# Altium PCB PCB-Powermodule-v7.0.3.PcbDoc (part 2 of 3)
Units mil, origin at the board's own origin, x right, y up, seen from the top; angles counter-clockwise.
Board outline 3937.01 x 1771.65 mil, 2 copper layers (Top Layer, Bottom Layer), stack 61.811 mil thick; 138 components, 96 nets, 573 pads, 259 vias.
Unrouted connection lines stored in the file: 20.
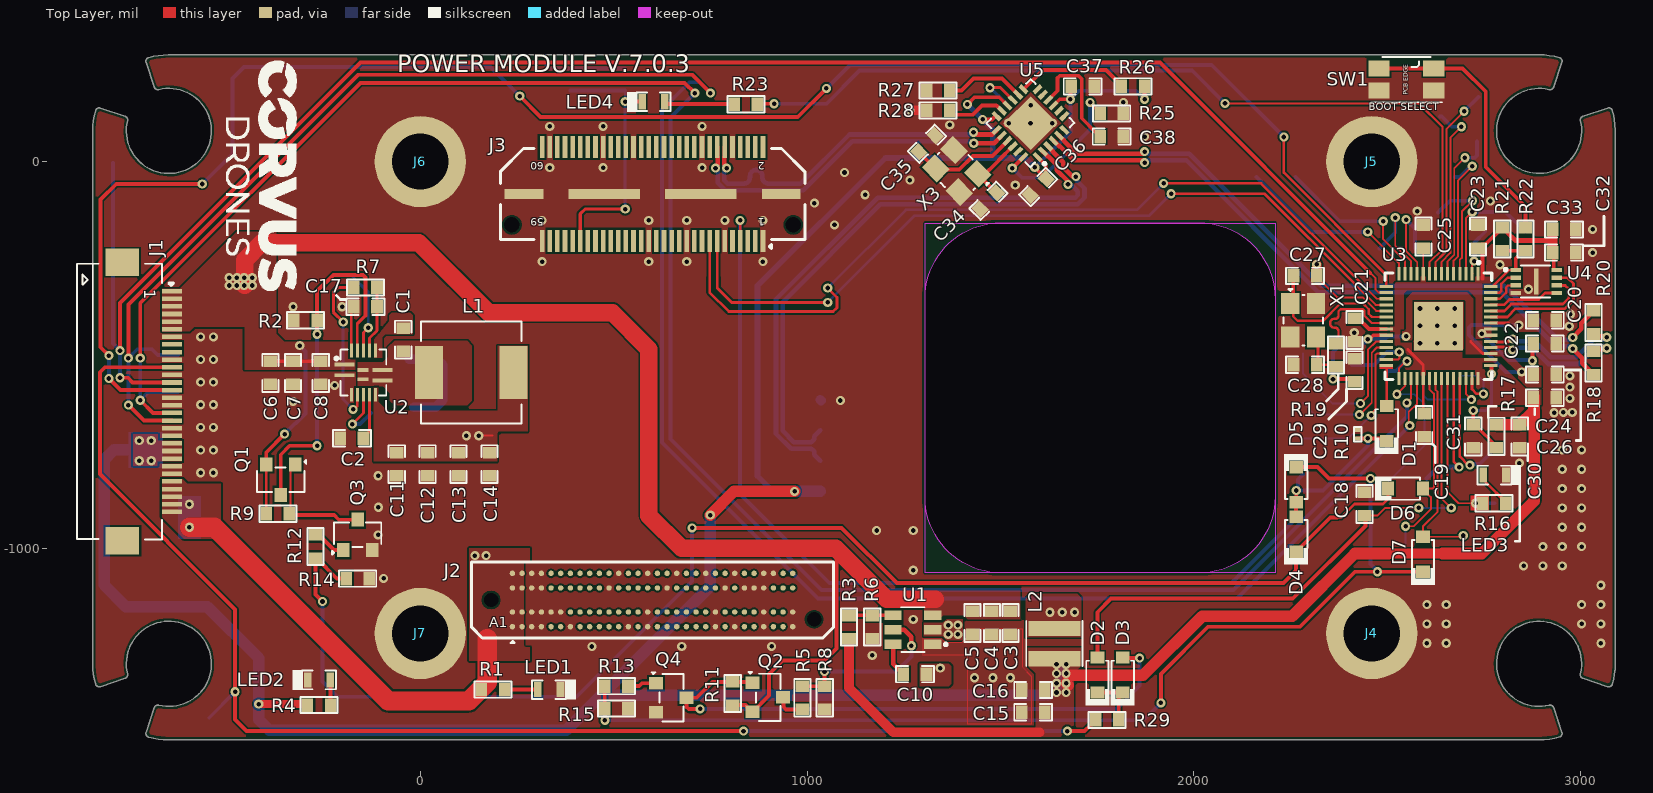
[diagram p0: Top Layer view]

## Part data (continued)
R9 R11: library part RC0603FR-071ML, "RES SMD 1M OHM 1% 1/10W 0603", Case Code (Imperial)=0603, Case Code (Metric)=1608, LCSC Part Number=C105578, MANUFACTURER=Yageo, Max Operating Temperature=155°C, Min Operating Temperature=-55°C, Package Quantity=5000, Power Rating=100mW, Resistance=1MR, Supplier Part Number 1=311-1.00MHRDKR-ND, Temperature Coefficient=100ppm/°C, Tolerance=1%, Voltage Rating=50V, Case/Package=0603, ComponentLink1Description=http://www.farnell.com/datasheets/2167052.pdf?src-supplier=Mouser, ComponentLink1URL=http://www.farnell.com/datasheets/2167052.pdf?src-supplier=Mouser, ComponentLink2Description=http://www.farnell.com/datasheets/2167052.pdf?src-supplier=Element14, ComponentLink2URL=http://www.farnell.com/datasheets/2167052.pdf?src-supplier=Element14, ComponentLink3Description=http://documents.rs-components.com/techlib://itc_doclist_GB.htm?stockno=5048956&src-supplier=RSComponents, ComponentLink3URL=http://documents.rs-components.com/techlib://itc_doclist_GB.htm?stockno=5048956&src-supplier=RSComponents, Composition="Thick Film", Depth=0.8mm, Height=0.45mm, Item Type=Resistor, Lead Free="Lead Free", Length=1.6mm, Manufacturer Part Number=RC0603FR-071ML, Military Standard=Not, Number of Pins=2, Packaging="Tape and Reel", Pricing 1="1=0.1, 10=0.023, 100=0.0094, 1000=0.00421, 2500=0.00366 (USD)", REACH SVHC="No SVHC", Stock 1=3824601, Supplier 1=Digi-Key, Termination=SMD/SMT, Voltage Rating (DC)=50V, Width=0.8mm
R10: library part RC0201FR-0710KL, "RES SMD 10K OHM 1% 1/20W 0201", LCSC Part Number=C106225, MANUFACTURER=Yageo, Package=0201, ComponentLink7Description=LCSC, ComponentLink7URL=https://www.lcsc.com/product-detail/Chip-Resistor-Surface-Mount_YAGEO-RC0201FR-0710KL_C106225.html, Item Type=Resistor, Manufacturer Part Number=RC0201FR-0710KL
R12 R13: library part RC0603JR-074K7L, "RES SMD 4.7K OHM 5% 1/10W 0603", Case Code (Imperial)=0603, Case Code (Metric)=1608, LCSC Part Number=C105428, MANUFACTURER=Yageo, Max Operating Temperature=155°C, Min Operating Temperature=-55°C, Power Rating=100mW, Resistance=4.7kR, Supplier Part Number 1=311-4.7KGRCT-ND, Temperature Coefficient=100ppm/°C, Tolerance=5%, Voltage Rating=50V, Case/Package=0603, ComponentLink1Description=http://www.farnell.com/datasheets/443971.pdf?src-supplier=Element14, ComponentLink1URL=http://www.farnell.com/datasheets/443971.pdf?src-supplier=Element14, Composition="Thick Film", Depth=0.8mm, Item Type=Resistor, Lead Free="Lead Free", Length=1.6mm, Manufacturer Part Number=RC0603JR-074K7L, Military Standard=Not, Number of Pins=2, Packaging="Tape and Reel", Pricing 1="1=0.1, 10=0.02, 100=0.0081, 1000=0.00362, 2500=0.00314 (USD)", REACH SVHC="No SVHC", Stock 1=19706643, Supplier 1=Digi-Key, Termination=SMD/SMT, Voltage Rating (DC)=50V, Width=0.8mm
R18 R20: library part RC0603FR-0727RL, "RES 27 OHM 1% 1/10W 0603", Case Code (Imperial)=0603, Case Code (Metric)=1608, LCSC Part Number=C137753, MANUFACTURER=Yageo, Max Operating Temperature=155°C, Max Power Dissipation=100mW, Min Operating Temperature=-55°C, Resistance Tolerance=1%, Resistor Type="Thick Film", Supplier Part Number 1=9798455, Temperature Coefficient=100ppm/°C, Voltage Rating=50V, Case/Package=0603, Category="Chip SMD Resistors", ComponentLink1Description=https://datasheet.ciiva.com/2454/pyu-r-int-thick-7-2454031.pdf?src-supplier=Digi-Key, ComponentLink1URL=https://datasheet.ciiva.com/2454/pyu-r-int-thick-7-2454031.pdf?src-supplier=Digi-Key, ComponentLink2Description=https://datasheet.ciiva.com/2454/pyu-r-int-thick-7-2454032.pdf?src-supplier=Digi-Key, ComponentLink2URL=https://datasheet.ciiva.com/2454/pyu-r-int-thick-7-2454032.pdf?src-supplier=Digi-Key, ComponentLink3Description=https://datasheet.ciiva.com/2454/pyu-r-int-thick-7-2454030.pdf?src-supplier=Digi-Key, ComponentLink3URL=https://datasheet.ciiva.com/2454/pyu-r-int-thick-7-2454030.pdf?src-supplier=Digi-Key, ComponentLink4Description=https://datasheet.ciiva.com/7746/443971-7746313.pdf?src-supplier=Element14, ComponentLink4URL=https://datasheet.ciiva.com/7746/443971-7746313.pdf?src-supplier=Element14, ComponentLink5Description=https://datasheet.ciiva.com/7746/443971-7746314.pdf?src-supplier=Element14, ComponentLink5URL=https://datasheet.ciiva.com/7746/443971-7746314.pdf?src-supplier=Element14, Features="Moisture Resistant", Item Type=Resistor, Lead Free="Lead Free", Manufacturer Part Number=RC0603FR-0727RL, Number of Terminations=2, Packaging="Tape and Reel", Pins=2, Power Rating=100mW, Pricing 1="5000=0.0015, 50000=0.0014, 200000=0.0014, 625000=0.0013, 2000000=0.0012 (USD)", Reach SVHC Compliant=Unknown, RoHS=Yes, RoHS Compliant=Yes, Series=RC, Stock 1=285000, Supplier 1="Future Electronics", Termination=SMD/SMT, Tolerance=1%, Voltage Rating (DC)=50V, Width=0.8mm
R19 R22 R24 R29: library part RT0603DRD071KL, "RES SMD 1K OHM 0.5% 1/10W 0603", Case Code (Imperial)=0603, Case Code (Metric)=1608, LCSC Part Number=C165964, MANUFACTURER=Yageo, Max Operating Temperature=125°C, Min Operating Temperature=-55°C, Power Rating=100mW, Resistance=1kR, Supplier Part Number 1=311-1.0KDDKR-ND, Temperature Coefficient=25ppm/°C, Tolerance=0.5%, Voltage Rating=75V, Voltage Rating (DC)=50V, Case/Package=0603, ComponentLink1Description=http://www.mouser.com/ds/2/447/yageodocoutput-1125656.pdf?src-supplier=Mouser, ComponentLink1URL=http://www.mouser.com/ds/2/447/yageodocoutput-1125656.pdf?src-supplier=Mouser, ComponentLink2Description=http://www.yageo.com/documents/recent/PYu-RT_1-to-0.05_RoHS_L_6.pdf?src-supplier=Avnet, ComponentLink2URL=http://www.yageo.com/documents/recent/PYu-RT_1-to-0.05_RoHS_L_6.pdf?src-supplier=Avnet, Composition="Thin Film", Contact Plating=Tin,Matte, Lead Free="Lead Free", Manufacturer Part Number=RT0603DRD071KL, Packaging="Tape and Reel", Pricing 1="1=0.2, 10=0.167, 100=0.0651, 1000=0.02725, 2500=0.02498 (USD)", Radiation Hardening=No, Stock 1=178947, Supplier 1=Digi-Key, Termination=SMD/SMT
R25: library part RTT031202BTP, "12kΩ 0603 Chip Resistor - Surface Mount ROHS", LCSC Part Number=C2981490, MANUFACTURER=RALEC, ComponentLink1Description=LCSC, ComponentLink1URL=https://lcsc.com/product-detail/Chip-span-style-background-color-ff0-Resistor-span-Surface-Mount_RALEC-RTT031202BTP_C2981490.html, Manufacturer Part Number=RTT031202BTP
R26 R27 R28: library part RT0603BRD0750KL, "RES 50K OHM 0.1% 1/10W 0603", Case/Package=0603, LCSC Part Number=C861451, MANUFACTURER=Yageo, Max Operating Temperature=155°C, Max Power Dissipation=100mW, Min Operating Temperature=-55°C, Supplier Part Number=3072856, Temperature Coefficient=25ppm/°C, Tolerance=0.1%, Voltage Rating=75V, Category="Chip SMD Resistors", ComponentLink1Description=https://www.yageo.com/upload/media/product/productsearch/datasheet/rchip/PYu-RT_1-to-0.01_RoHS_L_12.pdf?src-supplier=Digikey, ComponentLink1URL=https://www.yageo.com/upload/media/product/productsearch/datasheet/rchip/PYu-RT_1-to-0.01_RoHS_L_12.pdf?src-supplier=Digikey, Height=550um, Item Type=Resistor, Manufacturer Part Number=RT0603BRD0750KL, Number of Terminations=2, Packaging="Tape and Reel", Power Rating=100mW, Pricing="5000=0.0213, 15000=0.0206, 25000=0.0211, 50000=0.0198, 100000=0.0194, 200000=0.0186 (USD)", RoHS=No, Series=RT, Stock=70000, Supplier="Future Electronics"
SW1: "SWITCH TACTILE SPST-NO 0.05A 12V", Actuator Color=Black, Case/Package=SMD/SMT, Contact Current Rating=50mA, Contact Resistance=500mR, MANUFACTURER=Panasonic, Max Operating Temperature=70°C, Max Voltage Rating (DC)=12V, Min Operating Temperature=-20°C, Operating Force=1.6N, Package Quantity=5000, Supplier Part Number=667-EVQP7J01P, Actuator Length=0.65mm, Category="Tactile Switches", ComponentLink1Description=https://datasheet.ciiva.com/24076/atv0000ce4-259034-24076561.pdf?src-supplier=Mouser, ComponentLink1URL=https://datasheet.ciiva.com/24076/atv0000ce4-259034-24076561.pdf?src-supplier=Mouser, ComponentLink2Description=https://datasheet.ciiva.com/22777/atk0000ce20-22777575.pdf?src-supplier=Farnell, ComponentLink2URL=https://datasheet.ciiva.com/22777/atk0000ce20-22777575.pdf?src-supplier=Farnell, ComponentLink3Description=https://datasheet.ciiva.com/29974/atk0000ce20-29974069.pdf?src-supplier=Avnet, ComponentLink3URL=https://datasheet.ciiva.com/29974/atk0000ce20-29974069.pdf?src-supplier=Avnet, ComponentLink4Description=https://datasheet.ciiva.com/30252/atk0000ce20-30252044.pdf?src-supplier=Onlinecomponents.com, ComponentLink4URL=https://datasheet.ciiva.com/30252/atk0000ce20-30252044.pdf?src-supplier=Onlinecomponents.com, Current Rating=50mA, Electrical Life=100000Cycles, Height=1.35mm, Illumination Type=Non-Illuminated, Item Type=SWITCH, Lead Free="Lead Free", Length=3.5mm, Manufacturer Part Number=EVQ-P7J01P, Mechanical Life=100000Cycles, Mounting Technology="Surface Mount", Orientation="Right Angle", Packaging="Tape and Reel", Pricing="1=0.28, 10=0.252, 50=0.252, 100=0.217, 1000=0.173, 10000=0.148 (USD)", Radiation Hardening=No, Reach SVHC Compliant=No, RoHS=Yes, RoHS Compliant=Yes, Series=EVQP7, Stock=9778, Supplier=Mouser, Switch Function=Off-Mom, Switch Travel=0.2mm, Termination="Gull Wing", Throw Configuration=SPST, Voltage Rating (DC)=12V, Width=2.9mm
SW2: library part EVQ-P7J01P, "SWITCH TACTILE SPST-NO 0.05A 12V", Actuator Color=Black, Case/Package=SMD/SMT, Contact Current Rating=50mA, Contact Resistance=500mR, MANUFACTURER=Panasonic, Max Operating Temperature=70°C, Max Voltage Rating (DC)=12V, Min Operating Temperature=-20°C, Operating Force=1.6N, Package Quantity=5000, Supplier Part Number=667-EVQP7J01P, Actuator Length=0.65mm, Category="Tactile Switches", ComponentLink1Description=https://datasheet.ciiva.com/24076/atv0000ce4-259034-24076561.pdf?src-supplier=Mouser, ComponentLink1URL=https://datasheet.ciiva.com/24076/atv0000ce4-259034-24076561.pdf?src-supplier=Mouser, ComponentLink2Description=https://datasheet.ciiva.com/22777/atk0000ce20-22777575.pdf?src-supplier=Farnell, ComponentLink2URL=https://datasheet.ciiva.com/22777/atk0000ce20-22777575.pdf?src-supplier=Farnell, ComponentLink3Description=https://datasheet.ciiva.com/29974/atk0000ce20-29974069.pdf?src-supplier=Avnet, ComponentLink3URL=https://datasheet.ciiva.com/29974/atk0000ce20-29974069.pdf?src-supplier=Avnet, ComponentLink4Description=https://datasheet.ciiva.com/30252/atk0000ce20-30252044.pdf?src-supplier=Onlinecomponents.com, ComponentLink4URL=https://datasheet.ciiva.com/30252/atk0000ce20-30252044.pdf?src-supplier=Onlinecomponents.com, Current Rating=50mA, Electrical Life=100000Cycles, Height=1.35mm, Illumination Type=Non-Illuminated, Item Type=SWITCH, Lead Free="Lead Free", Length=3.5mm, Manufacturer Part Number=EVQ-P7J01P, Mechanical Life=100000Cycles, Mounting Technology="Surface Mount", Orientation="Right Angle", Packaging="Tape and Reel", Pricing="1=0.28, 10=0.252, 50=0.252, 100=0.217, 1000=0.173, 10000=0.148 (USD)", Radiation Hardening=No, Reach SVHC Compliant=No, RoHS=Yes, RoHS Compliant=Yes, Series=EVQP7, Stock=9778, Supplier=Mouser, Switch Function=Off-Mom, Switch Travel=0.2mm, Termination="Gull Wing", Throw Configuration=SPST, Voltage Rating (DC)=12V, Width=2.9mm
U1: "IC REG BUCK ADJ 3A TSOT23-6", Case/Package=SOT-23-6, LCSC Part Number=C116592, MANUFACTURER="Texas Instruments", Max Input Voltage=17V, Max Operating Temperature=125°C, Max Output Voltage=7V, Min Input Voltage=4.5V, Min Operating Temperature=-40°C, Min Output Voltage=768mV, Output Current=3A, Quiescent Current=400uA, Supplier Part Number 1=296-47238-6-ND, Switching Frequency=580kHz, ComponentLink1Description=http://www.ti.com/lit/ds/symlink/tps563201.pdf?src-supplier=Digi-Key, ComponentLink1URL=http://www.ti.com/lit/ds/symlink/tps563201.pdf?src-supplier=Digi-Key, ComponentLink2Description=http://www.ti.com/general/docs/suppproductinfo.tsp?distId=10&amp;gotoUrl=http%3A%2F%2Fwww.ti.com%2Flit%2Fgpn%2Ftps563201&src-supplier=Digi-Key, ComponentLink2URL=http://www.ti.com/general/docs/suppproductinfo.tsp?distId=10&amp;gotoUrl=http%3A%2F%2Fwww.ti.com%2Flit%2Fgpn%2Ftps563201&src-supplier=Digi-Key, ComponentLink3Description=http://www.ti.com/lit/gpn/tps563201?src-supplier=Mouser, ComponentLink3URL=http://www.ti.com/lit/gpn/tps563201?src-supplier=Mouser, Item Type=IC, Lead Free="Lead Free", Manufacturer Part Number=TPS563201DDCR, Mount="Surface Mount", Number of Outputs=1, Number of Pins=6, Output Configuration=Positive, Output Type=Adjustable, Packaging="Tape and Reel", Pricing 1="1=0.92, 10=0.812, 25=0.7628, 100=0.5781, 250=0.492, 500=0.4674, 1000=0.3567 (USD)", Stock 1=0, Supplier 1=Digi-Key, Synchronous Rectifier=Yes
U2: "Step-down type Fixed 5V 5V~23V 6A QFN-16(3x3) DC-DC Converters ROHS", LCSC Part Number=C425179, MANUFACTURER=Richtek, Supplier Part Number=1028-RT7291AGQUFCT-ND, Category="Voltage Regulators - Switching", Item Type=IC, Manufacturer Part Number=RT7291AGQUF, Pricing="1=2.62, 10=2.355, 25=2.222, 100=1.8931, 250=1.7776, 500=1.5554 (USD)", RoHS=No, Stock=1332, Supplier=Digi-Key
U3: "Rectifier Diode, 1 Phase, 1 Element, 2A, 400V V(RRM), Silicon, DO-15", MANUFACTURER="Raspberry Pi", Supplier Part Number=3766079, Category=Uncategorized, Manufacturer Part Number=RP2040TR7, Pricing="500=0.645 (GBP)", RoHS=No, Stock=11495, Supplier=Farnell
U4: "IC FLASH 16MBIT SPI/QUAD 8USON", MANUFACTURER=Winbond, Supplier Part Number=256-W25Q16JVUXIQTRCT-ND, Category=Memory, Manufacturer Part Number="W25Q16JVUXIQ TR", Pricing="1=0.56, 10=0.51, 25=0.504, 50=0.501, 100=0.4479, 250=0.44416, 500=0.43758, 1000=0.42193 (USD)", RoHS=No, Stock=47295, Supplier=Digi-Key
U5: "Hub Controller USB QFN-24-EP(4x4) USB ICs ROHS", LCSC Part Number=C633330, MANUFACTURER=Microchip, Category="USB Interface ICs", ComponentLink1Description=http://components.arrow.com/part/dataview/58768923S663889N2064?src-supplier=Arrow+Electronics, ComponentLink1URL=http://components.arrow.com/part/dataview/58768923S663889N2064?src-supplier=Arrow+Electronics, ComponentLink2Description=http://www.mouser.com/ds/2/268/2422-319423.pdf?src-supplier=Mouser, ComponentLink2URL=http://www.mouser.com/ds/2/268/2422-319423.pdf?src-supplier=Mouser, ComponentLink3Description=http://www.microchip.com/mymicrochip/filehandler.aspx?ddocname=en566992&src-supplier=Digikey, ComponentLink3URL=http://www.microchip.com/mymicrochip/filehandler.aspx?ddocname=en566992&src-supplier=Digikey, ComponentLink4Description=https://datasheet.octopart.com/USB2422-MJ-Microchip-datasheet-42223901.pdf?src-supplier=Future+Electronics, ComponentLink4URL=https://datasheet.octopart.com/USB2422-MJ-Microchip-datasheet-42223901.pdf?src-supplier=Future+Electronics, Item Type=IC, Manufacturer Part Number=USB2422/MJ, Pricing="490=1.5 (USD)", RoHS=Yes, Stock=330, Supplier=Avnet, Supplier Part Number=USB2422/MJ
U6: "Intelligent WiFiI Module 1200M Dual Band+AC (High Power)", ComponentLink1Description=Aliexpress, ComponentLink1URL=https://www.aliexpress.com/item/1005005638445796.html?spm=a2g0o.order_list.order_list_main.29.65f179d27FZF0V&gatewayAdapt=glo2nld, Item Type=Module, Manufacturer Part Number=BL-R8812AF1
X1: library part MCSJK-7U-12.00-10-10-80-B-10, "Crystal, 12Mhz, 10Pf, 3.2Mm X 2.5Mm Frequency Nom 12Mhz Crystal Case Smd Rohs", MANUFACTURER=Multicomp, Supplier Part Number=56AC8904, ComponentLink1Description=http://www.farnell.com/datasheets/2645227.pdf?src-supplier=Farnell, ComponentLink1URL=http://www.farnell.com/datasheets/2645227.pdf?src-supplier=Farnell, Item Type=Crystal, Manufacturer Part Number=MCSJK-7U-12.00-10-10-80-B-10, Pricing="1=0.428, 10=0.381, 100=0.3, 500=0.246, 1000=0.214, 5000=0.191, 10000=0.172, 25000=0.166 (USD)", RoHS=Yes, Stock=26807, Supplier=Newark
X3: library part MCSJK-7U-24.00-12-10-60-B-10, "Crystal, 24Mhz, 12Pf, 3.2Mm X 2.5Mm", MANUFACTURER=Multicomp, Supplier Part Number=56AC8946, Item Type=Crystal, Manufacturer Part Number=MCSJK-7U-24.00-12-10-60-B-10, Pricing="5=0.328, 250=0.253, 500=0.227, 1000=0.207, 5000=0.189 (USD)", RoHS=No, Stock=5313, Supplier=Newark

## Via types
v1: diameter 23.62, hole 11.81, Top Layer to Bottom Layer, tented both sides, 257 vias
v2: diameter 23.62, hole 11.81, Top Layer to Bottom Layer, 2 vias

## Nets (pads, with @x,y where several pads share a name; then routed paths per layer and width w, separated by ;. In a path a pad name is that pad's centre, name@x,y a point inside that pad or via, vN(x,y) a via of type N, cw(c..) or ccw(c..) an arc to the next point about the centre after c; other vN are vias at no path point)
+1V1: C20.2 C26.2 C29.2 U3.23 U3.45 U3.50 | length 818.2
  Top Layer w7: 2716.15,-465.61 2747.03,-496.48 U3.45@2768.15,-496.48 ; U3.50@2768.15,-417.74 2814.03,-417.74
  Top Layer w10: v1(2360,-562.61) 2409.8,-562.61 C29.2@2412.8,-559.61 ; v1(2450.31,-459.29) 2454,-459.29 2464.06,-449.23 U3.23@2497.45,-449.23
  Bottom Layer w10: v1(2360,-562.61) 2360,-492.35 2371.75,-480.59 2429.01,-480.59 v1(2450.31,-459.29) 2494.71,-459.29 2502,-452 v1(2549,-452) ; v1(2841,-423) 2718,-423 2712.14,-428.86 2712.14,-448.36 2807.79,-544 v1(2848,-544)
+3V3: C15.2 C16.2 C19.1 C21.1 C22.2 C23.2 C24.1 C25.2 C30.2 C32.2 C33.2 C36.2 C37.2 J1.21 J1.22 J1.23 L2.2 P7.1 R3.2 R4.2 R17.2 R21.2 R26.1 U3.1 U3.10 U3.22 U3.33 U3.42 U3.44 U3.48 U3.49 U4.8 U5.1 U5.9 U5.16 U5.18 U6.2 | length 10149.7
  Top Layer w5: U3.10@2593.43,-290.26 2593.43,-224.57 C25.2@2594,-224
  Top Layer w7: 2553.29,-486.29 2593.44,-526.44 C19.1@2593.44,-654.58
  Top Layer w10: v1(1414.42,147.81) 1432.8,166.18 1497.09,166.18 U5.16@1518.42,144.85 ; v1(1453.97,109.06) 1477.81,109.06 1487.81,119.06 U5.18@1490.33,116.54 ; v1(1588.88,-15.22) C36.2@1618.06,-44.4 ; U5.1@1595.76,11.84 1617.25,-9.65 C36.2@1617.25,-42.63 ; U5.9@1637.51,145.18 1653.33,161 v1(1681,161) 1681,192.59 C37.2@1682.8,194.39 ; v1(1872.8,161) R26.1@1872.8,187.73 ; C21.1@2425.3,-403.61 2425.3,-406.11 2452.67,-433.48 U3.22@2497.45,-433.48 ; 2747,-302 2746.57,-301.57 2746.57,-266.75 2746.91,-266.41 2746.91,-234 2736.91,-224 C23.2@2735,-224 2745,-214 2754.41,-214 2785.3,-183.11 2785.3,-180.61 2795.3,-170.61 R21.2@2797.8,-170.61 ; v1(2875.85,-515.15) 2875.85,-472.56 C22.2@2877.8,-470.61 ; C32.2@2927.8,-235.61 2931.05,-238.86 U4.8@2931.05,-280.63
  Top Layer w12: R21.2@2796.12,-166.43 2809.3,-179.61 2809.3,-182.11 2831.19,-204 2921.9,-204
  Top Layer w20: v1(-418,-1403) -294.81,-1403 R4.2@-292.2,-1405.61
  Top Layer w25: R3.2@1108.39,-1233.8 1108.39,-1361.39 1223,-1476 1602,-1476 ; 2502.8,-1013.61 2643.39,-1013.61 ; C32.2@2927.8,-235.61 C33.2@2927.8,-175.61
  Top Layer w30: v1(749.68,-914.44) 811.12,-853 v1(967.6,-853) ; v1(1670,-1349) v1@1674.85,-1353.85 ; v1@1674.85,-1328.85 1868.83,-1328.85 2022.18,-1175.5 2255.02,-1175.5 2416.91,-1013.61 2502.8,-1013.61 ; 2643.39,-1013.61 2744.39,-1013.61 2880.3,-877.7 2880.3,-643.61 ; R17.2@2782.8,-680.61 C30.2@2842.8,-680.61 2879.8,-643.61 C24.1@2879.8,-608.61
  Bottom Layer w10: v1(1588.88,-15.22) 1681,76.89 v1(1681,161) 1702.98,182.98 1850.82,182.98 v1(1872.8,161) ; v1(2745,-444.81) 2813.19,-513 2873.7,-513 v1(2875.85,-515.15)
  Bottom Layer w15: v1(967.6,-853) 912,-853 872,-813 872,-321.11 1202.61,9.51 1564.15,9.51 v1(1588.88,-15.22) ; v1@1414.83,147.81 v1@1453.57,109.06 ; v1(1453.97,109.06) 1480.39,82.64 1480.39,9.51
  Bottom Layer w20: v1(1414.42,147.81) v1@1414.83,147.81 ; v1@1453.57,109.06 v1(1453.97,109.06)
  Bottom Layer w30: v1(-696,-721.61) -696,-744.41 P7.1@-697.2,-745.61 -792.39,-745.61 -817.79,-771.01 -817.79,-1094.88 -761.67,-1151 -551,-1151 -418,-1284 v1(-418,-1403) -418,-1443 -390.39,-1470.61 377.39,-1470.61 467.75,-1380.25 ; v1(749.68,-914.44) 749.68,-1098.32 467.75,-1380.25 ; v1(967.6,-853) 1032.95,-853 U6.2@1033.84,-852.11 ; 1612.26,-1380.25 467.75,-1380.25 ; 1623,-1380 v1@1649.5,-1353.5 ; 1657,-1346 1657,-1297.03
  other v1: 1645,-1373 1670,-1373 1645,-1349 1645,-1324 1670,-1324 1645,-1300 1670,-1300 -727.17,-773.57 -696,-773.57 -727.17,-721.61
+5V: C11.2 C12.2 C13.2 C14.2 J1.26 J1.27 J1.28 J1.29 J1.30 J2.A01 J2.A02 J2.B01 J2.B02 J2.C01 J2.C02 J2.D01 J2.D02 L1.2 P2.1 R1.2 U2.7 | length 1126
  Top Layer w5: v1@151,-710 152,-709 183,-709 184,-708 187,-708
  Top Layer w50: v1(-597.2,-945.61) -532.39,-945.61 -83,-1395 125,-1395 157.34,-1362.65 172.8,-1347.2 172.8,-1234
  other v1: 141,-1019 170,-1019 -597.2,-886.34 119,-709 151,-709
ADC_AVDD: C31.2 R17.1 U3.43 | length 268.2
  Top Layer w8: C31.2@2726.8,-680.61 R17.1@2782.8,-736.61
  Top Layer w10: C31.2@2722.8,-680.61 v1(2722.8,-643.82) ; v1(2769.65,-549.1) U3.43@2769.65,-529.97
  Bottom Layer w8: v1(2722.8,-643.82) 2723.01,-643.61 2755.39,-643.61 2769.65,-629.35 v1(2769.65,-549.1)
BOOTSEL_MCU: J3.17
CLK: P1.1 U2.5 | length 149.3
  Top Layer w7: v1(-176,-679) -147.2,-650.2 U2.5@-147.2,-602.68
  Bottom Layer w10: v1(-176,-679) -156,-679 P1.1@-127,-650
D_N: R18.2 U5.4 | length 1661
  Top Layer w12: U5.4@1637.51,53.6 1638.2,53.6 1651.66,40.14 1652.87,40.14 1690.01,3 1866.99,3 v1(1872.8,-2.81) ; v1(2980,-483.62) 3005,-508.62 3005,-522 3022.5,-539.5 3022.5,-542 3031.5,-551 R18.2@3034,-551
  Bottom Layer w12: v1(1872.8,-2.81) 1875.95,-2.81 1881.76,3 1981.12,3 2322.12,-338 2796,-338 2935.81,-477.81 2971.04,-477.81 2976.86,-483.62 v1(2980,-483.62)
D_P: R20.2 U5.5 | length 1648.6
  Top Layer w12: U5.5@1651.43,67.51 1651.43,66.82 1664.89,53.37 1664.89,52.16 1697.05,20 1866.99,20 v1(1872.8,25.81) ; v1(2980,-455) 3002.36,-432.64 3002.36,-417.64 3022.5,-397.5 3022.5,-395 3031.5,-386 R20.2@3034,-386
  Bottom Layer w12: v1(1872.8,25.81) 1875.95,25.81 1881.76,20 1988.16,20 2329.16,-321 2803.04,-321 2942.85,-460.81 2971.04,-460.81 2976.86,-455 v1(2980,-455)
EN_3V3_BUCK: Q2.3 R5.1 | length 76.3
  Top Layer w10: Q2.3@938.17,-1385.61 939,-1386.44 939,-1410 945.61,-1416.61 R5.1@987.8,-1416.61
EN_VOXL: Q1.3 R2.1 U2.13 | length 946.6
  Top Layer w7: U2.13@-162.94,-488.52 -162.94,-419.39
  Top Layer w8: -162.94,-419.39 -142.19,-398.64
  Top Layer w10: Q1.3@-361.2,-859.24 -361.2,-758.2 -338,-735 v1(-267.2,-735) ; v1(-267.2,-446.64) R2.1@-267.2,-411.81 ; R2.1@-267.2,-410.61 -267.2,-335.2 -225.06,-293.05 -148.51,-293.05 -142.19,-299.38 -142.19,-398.64
  Bottom Layer w10: v1@-276,-735 v1@-275.61,-734.6 ; v1(-267.2,-735) v1(-267.2,-446.64)
ENLDO: P8.1 U2.12 | length 215.6
  Top Layer w7: U2.12@-147.2,-488.51 -147.19,-442.19 v1(-134.82,-429.82)
  Bottom Layer w7: P8.1@-177.2,-295.61 -134.82,-337.99 v1(-134.82,-429.82)
GND: C2.1 C3.1 C4.1 C5.1 C6.1 C7.1 C8.1 C11.1 C12.1 C13.1 C14.1 C15.1 C16.1 C17.1 C18.1 C19.2 C20.1 C21.2 C22.1 C23.1 C24.2 C25.1 C26.1 C27.2 C28.2 C29.1 C30.1 C31.1 C32.1 C33.1 C34.1 C35.2 C36.1 C37.1 C38.1 J1.7 J1.10 J1.12 J1.15 J1.16 J1.19 J1.20 J1.24 J1.25 J2.A03 J2.A04 J2.A07 J2.A13 J2.A15 J2.A22 J2.A24 J2.A27 J2.A30 J2.B03 J2.B04 J2.B05 J2.B06 J2.B15 J2.B22 J2.B27 J2.B30 J2.C03 J2.C04 J2.C11 J2.C17 J2.C23 J2.C25 J2.C26 J2.C27 J2.D03 J2.D04 J2.D12 J2.D15 J2.D18 J2.D21 J2.D24 J2.D27 J2.D28 J3.01 J3.10 J3.11 J3.18 J3.21 J3.31 J3.36 J3.44 J3.58 J3.59 J3.G1 J3.G2 J3.G3 J3.G4 J4.1 J5.1 J6.1 J7.1 LED1.2 LED2.2 LED3.2 P4.1 P5.1 P32.1 Q3.2 Q4.2 R2.2 R6.2 R8.1 R10.1 R14.2 R15.2 R24.2 R25.2 R27.1 R28.1 SW1.1 U1.1 U2.2 U2.3 U2.14 U3.19 U3.57 U4.4 U4.9 U5.25 U6.5 U6.7 U6.9 U6.10 U6.12 X1.2 X1.4 X3.2 X3.4 | length 696.4
  Top Layer w5: C27.2@2317.8,-298.11 2370.8,-351.11 2436.52,-351.11 2471.65,-386.25 U3.19@2497.45,-386.24
  Top Layer w6: -178.69,-442.14 C17.1@-178.69,-382.14
  Top Layer w7: U2.14@-178.69,-488.51 -178.69,-442.14
  Top Layer w20: R25.2@1817.8,124.39 1817.9,124.49 1817.9,152.9 v1(1818,153)
  Top Layer w25: v1(1265.87,132.43) R28.1@1308.78,132.43 ; U5.25@1521,99 U5.25@1521.39,99.39 ; U5.25@1577.8,145.96 U5.25@1577.92,146.08 ; C27.2@2317.8,-298.11 C27.2@2317.8,-295.61 v1(2317.8,-265.84)
  Bottom Layer w25: U6.7@-29.15,-511.56 43.36,-511.56 58,-526.2 58,-617 40,-635 U6.9@-16.82,-635 ; U6.5@1033.84,-615.89 U6.5@1035.95,-618
  other v1: 1433,-1335 1480.52,-1335 1525.95,-1335 1168.39,-1277 443.63,-1254.11 676,-1254 908.37,-1253.89 2602.8,-1245.61 2652.8,-1245.61 3052.8,-1245.61 2602.8,-1195.61 2652.8,-1195.61 3002.8,-1195.61 3052.8,-1195.61 1274.5,-1183.96 2602.8,-1145.61 2652.8,-1145.61 3002.8,-1145.61 3052.8,-1145.61 3052.8,-1095.61 -95,-1077.97 1274.5,-1057.03 2852.8,-1045.61 2902.8,-1045.61 2952.8,-1045.61 2902.8,-995.61 2952.8,-995.61 3002.8,-995.61 -109.2,-965.61 1180,-954.14 1274.5,-954.14 2952.8,-945.61 3002.8,-945.61 2952.8,-895.61 3002.8,-895.61 -108.66,-894 2952.8,-845.61 3002.8,-845.61 -109.2,-812.61 -568.17,-804.61 -535.17,-804.61 2952.8,-795.61 3002.8,-795.61 2842,-780 -568.17,-746.05 -535.17,-746.05 2952.8,-745.61 3002.8,-745.61 -568.17,-687.49 -535.17,-687.49 2931.8,-649.61 2955.8,-648.61 2978.8,-648.61 -568.17,-628.94 -535.17,-628.94 -329.19,-620.39 1086,-618 2972.8,-612.61 2972.8,-583.43 -222,-579 -568.17,-570.38 -535.17,-570.38 2972.8,-554.24 -568.17,-511.82 -535.17,-511.82 2585,-470 2630,-470 2675,-470 -568.17,-453.27 -535.17,-453.27 2415,-442.42 2971,-425.98 2585,-425 2630,-425 2675,-425 2973.85,-394.85 2585,-380 2630,-380 2675,-380 -329.19,-375.61 -202.61,-375.61 2865.68,-330.15 2792,-267 314.97,-258.57 590.56,-258.57 688.98,-258.57 885.83,-258.57 3031.5,-235.61 3031.5,-175.61 1071,-163.78 314.97,-152.15 590.56,-152.15 688.98,-152.15 787.41,-152.15 885.83,-152.15 2578,-128 1018.97,-107.35 2767,-102 1150,-86 1538.27,-61.08 1265.87,-48 1096.75,-28.35 334.65,-15.57 472.45,-15.57 728.35,-15.57 1872.8,64.39 334.65,90.85 472.45,90.85 728.35,90.85 1368.78,94.94 1521,99.39 1577.8,99.39 1634.19,99.39 1578.49,146.08
GPIO0: P11.1 U3.2 | length 122.4
  Top Layer w5: U3.2@2719.41,-290.26 2719.41,-271.1 cw(c2738.82,-271.1) v1(2725.1,-257.38)
  Top Layer w6: U3.2@2719.41,-290.26 U3.2@2720.35,-289.32
  Bottom Layer w10: v1@2725.8,-256.68 2725.8,-209.61 P11.1@2753.8,-181.61
GPIO1: P10.1 U3.3 | length 326.2
  Top Layer w5: U3.3@2703.67,-290.26 2703.66,-146.34 v1(2720,-130)
  Bottom Layer w10: v1(2720,-130) 2806.19,-130 P10.1@2857.8,-181.61
GPIO2: P12.1 U3.4 | length 304.6
  Top Layer w5: U3.4@2687.92,-290.26 2687.91,-254.56 2693.66,-248.81 2693.66,-128.98 v1(2721.24,-101.41)
  Bottom Layer w10: P12.1@2632,-132 2662.6,-101.41 v1(2721.24,-101.41)
GPIO3: P13.1 U3.5 | length 353.7
  Top Layer w5: U3.5@2672.17,-290.26 2672.16,-256.17 2683.66,-244.66 2683.66,-48.34 v1(2720,-12)
  Bottom Layer w10: P13.1@2676,-40 2688.07,-40 2713.46,-14.61 2717.39,-14.61 v1(2720,-12)
GPIO4: P14.1 U3.6 | length 388.8
  Top Layer w5: U3.6@2656.42,-290.26 2656.41,-257.78 2673.66,-240.52 2673.66,-133.91 2673.66,-17.34 v1(2701,10)
  Bottom Layer w10: v1(2701,10) 2727,10 2732,15 P14.1@2732,52
GPIO5: P15.1 U3.7 | length 467.7
  Top Layer w5: U3.7@2640.67,-290.26 2640.66,-259.38 2663.66,-236.38 2663.66,-129.77 2663.66,61.66 v1(2692,90)
  Bottom Layer w10: P15.1@2636.8,116.39 2641.27,116.39 2667.66,90 v1(2692,90)
GPIO6: P9.1 U3.8 | length 505.3
  Top Layer w5: U3.8@2624.93,-290.26 2624.91,-259.98 2647.1,-237.79 2653.66,-231.23 2653.66,84.82 v1(2699,130)
  Bottom Layer w5: P9.1@2736.39,167.39 P9.1@2737.8,167.39
  Bottom Layer w10: v1(2699,130) P9.1@2736.39,167.39
GPIO7: R23.2 U3.9 | length 2261.8
  Top Layer w5: U3.9@2609.18,-290.26 2609.16,-260.88 2643.66,-226.38 2643.66,-223.27 2643.16,-223.27
  Top Layer w6: v1(2080.81,150.34) 2582.66,150.34 2643.16,89.84 2643.16,-223.27
  Top Layer w10: R23.2@871.81,149.39 v1(914.81,149.39)
  Bottom Layer w10: v1(914.81,149.39) 1049.8,149.39 1135.41,235 1996.15,235 v1(2080.81,150.34)
GPIO8_TX1: P30.1 U3.11 | length 235.9
  Top Layer w5: v1(2549.18,-150.03) 2549.18,-231.41 2577.93,-260.17 U3.11@2577.93,-290.01
  Bottom Layer w10: v1(2549.18,-150.03) 2572,-172.85 P30.1@2572,-224.61
GPIO9_RX1: P31.1 U3.12 | length 258.9
  Top Layer w5: v1(2521,-145) 2521,-217.38 2561.93,-258.31 U3.12@2561.93,-290.26
  Bottom Layer w10: P31.1@2479.84,-224.61 2521,-183.45 v1(2521,-145)
GPIO10: P34.1 U3.13 | length 433.4
  Top Layer w5: v1(2489.84,-154.5) 2489.84,-200.36 2546.19,-256.7 U3.13@2546.19,-290.26
  Bottom Layer w10: P34.1@2263,-40 2377.5,-154.5 v1(2489.84,-154.5)
GPIO11: P35.1 U3.14 | length 488.3
  Top Layer w5: v1(2449.84,-182) 2530.44,-262.6 U3.14@2530.44,-290.26
  Bottom Layer w10: P35.1@2162.02,-40 2304.02,-182 v1(2449.84,-182)
GPIO12: J1.14 U3.15 | length 4641.1
  Top Layer w7: v1(2233,63.52) 2233,-28.28 2497.45,-292.73 U3.15@2497.45,-323.25
  Top Layer w10: v1(-805.42,-561.01) -805.42,-561.32 -785.85,-580.89 -785.54,-580.89 -775.35,-591.08 J1.14@-648.22,-591.08 ; v1(-805.42,-502) -827.09,-480.33 -827.09,-98.49 -786.6,-58 v1(-564,-58) ; v1(256.91,169.09) 311.02,114.98 975.89,114.98 v1(1050,189.09)
  Bottom Layer w10: v1(-805.42,-561.01) v1(-805.42,-502) ; v1(-564,-58) -486,20 -486,215 -456.13,244.87 181.13,244.87 v1(256.91,169.09) ; v1(1050,189.09) 1110.91,250 2046.52,250 v1(2233,63.52)
GPIO16: P36.1 U3.27 | length 188.6
  Top Layer w5: U3.27@2497.45,-512.22 2528.55,-512.22 2531.48,-509.3 v1(2531.48,-492.54)
  Bottom Layer w10: P36.1@2409,-526 2465.9,-526 2499.67,-492.23 2531.17,-492.23 v1(2531.48,-492.54)
GPIO17: D1.2 U3.28 | length 105.5
  Top Layer w7: U3.28@2497.45,-527.97 2498.35,-527.96 2498.8,-528.41 D1.2@2498.8,-632.33